# Altium PCB DAP-PCB-REV-4.PcbDoc (part 2 of 4)
Units mil, origin at the board's own origin, x right, y up, seen from the top; angles counter-clockwise.
Board outline 2559.06 x 2559.06 mil, 6 copper layers (L1 (SIG/PWR), L2 (GND), L3 (SIG), L4 (PWR), L5 (GND), L6 (SIG/PWR)), stack 64.976 mil thick; 309 components, 179 nets, 965 pads, 300 vias.
Unrouted connection lines stored in the file: 157.
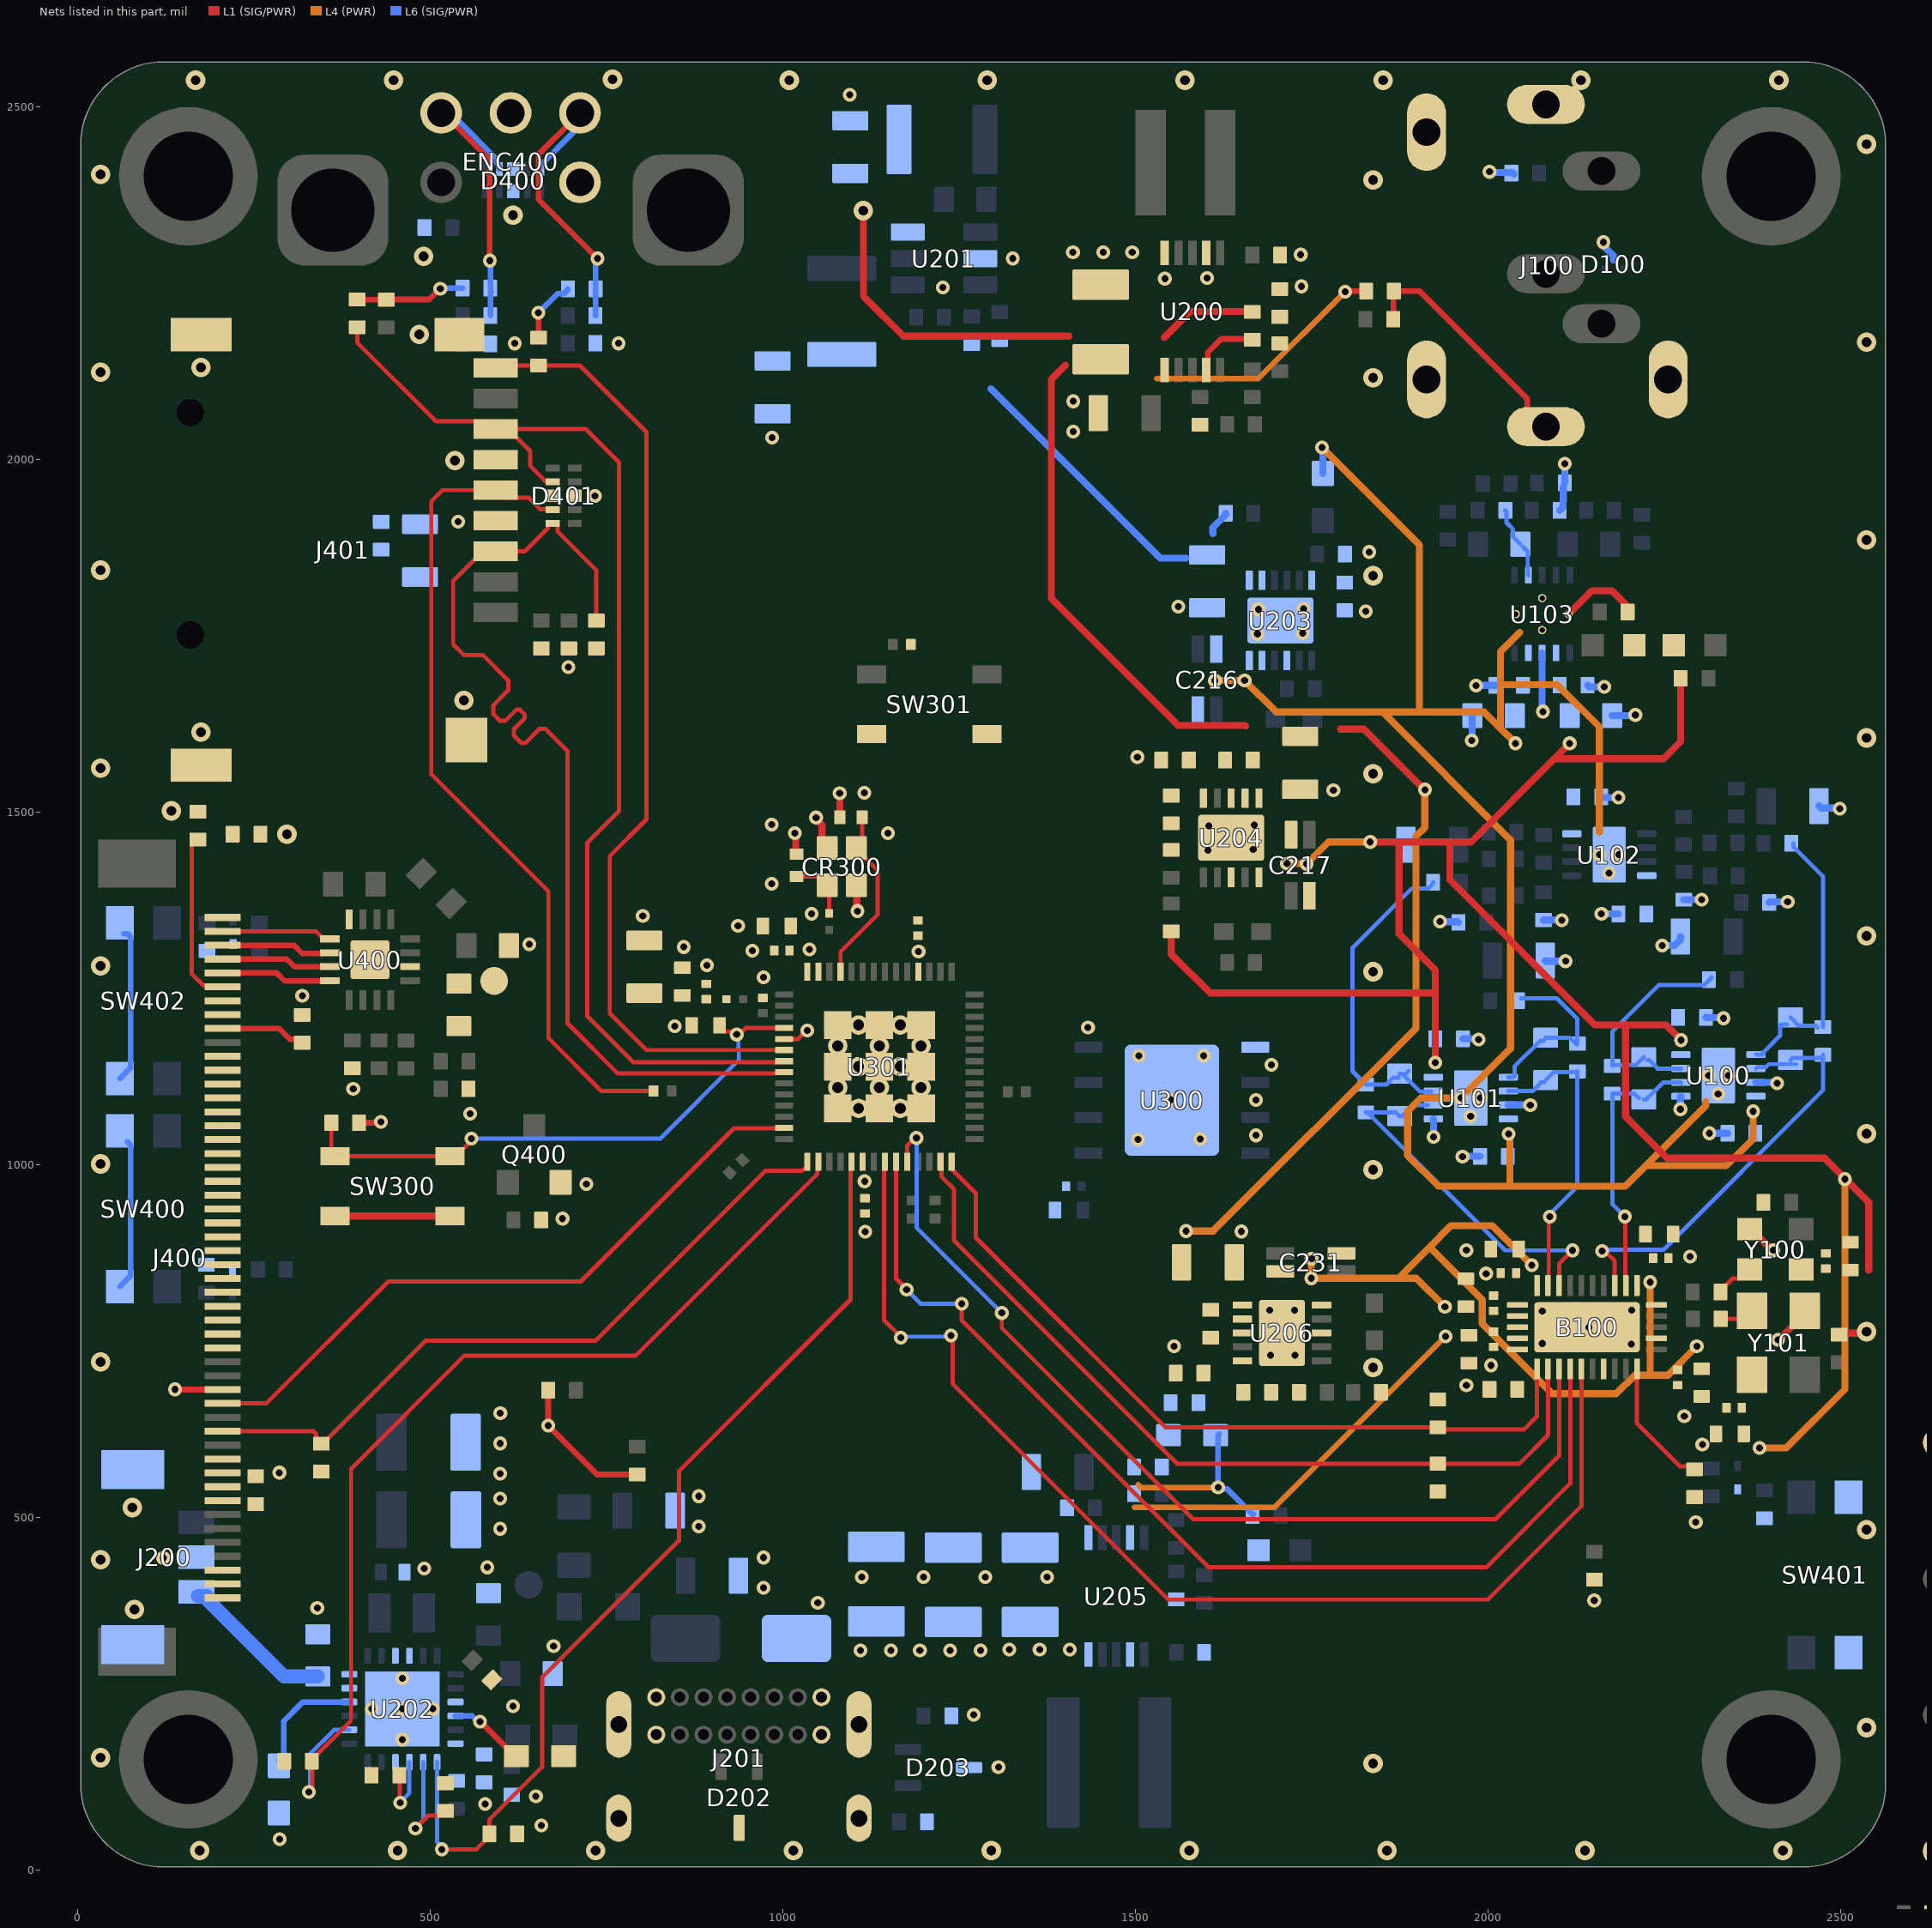
[diagram p5: the nets of this part, all layers, seen from the top]

## Part data (continued)
C103 C104 C112 C114 C116 C120 C139 C302 C303 C306 C307 C311: library part #1-144, <Rating>=25V, <Tolerance>=0.1, <Value>=0.1uF, Manufacturer 1="Murata Electronics", Manufacturer Part Number 1=GRM033R61E104KE14D, Supplier Part Number 1=490-12686-1-ND, <Footprint>=0201, <Spec>=X5R, <Termination>=SMD, AL-PN=#1-144, Creator Project=DAP, Footprint Status=Verified, Lead Time="17 Weeks", PartType=Capacitor, Status=Unverified, SubType=Ceramic, Supplier 1=Digikey, Supplier Label="0.1 µF ±10% 25V Ceramic Capacitor X5R 0201 (0603 Metric)", Type=Standard
C108 C109 C110 C111 C125 C126 C128 C133 C134 C213 C230 C234 C400 C407 C408: library part #1-080, <Rating>=50V, <Tolerance>=0.1, <Value>=0.1uF, Manufacturer 1="Murata Electronics", Manufacturer Part Number 1=GCM155R71H104KE02D, Supplier Part Number 1=490-10672-1-ND, <Footprint>=0402, <Spec>=X7R, <Termination>=SMD, AL-PN=#1-080, Creator Project=DAP, Footprint Status=Verified, Lead Time="21 Weeks", PartType=Capacitor, Status=Unverified, SubType=Ceramic, Supplier 1=Digikey, Supplier Label="0.1 µF ±10% 50V Ceramic Capacitor X7R 0402 (1005 Metric)", Type=Standard
C117: library part #1-103, <Rating>=6.3V, <Tolerance>=0.2, <Value>=4.7uF, Manufacturer 1="Murata Electronics", Manufacturer Part Number 1=GRM155R60J475ME47D, Supplier Part Number 1=490-5915-1-ND, <Footprint>=0402, <Termination>=SMD, AL-PN=#1-103, Creator Project=DAP, Footprint Status=Verified, Lead Time="17 Weeks", PartType=Capacitor, Status=Unverified, SubType=Ceramic, Supplier 1=Digikey, Supplier Label="4.7 µF ±20% 6.3V Ceramic Capacitor X5R 0402 (1005 Metric)", Type=Standard
C118 C123 C132 C137: library part #1-107, <Rating>=50V, <Tolerance>=0.02, <Value>=2.7nF, Manufacturer 1="Murata Electronics", Manufacturer Part Number 1=GRM1555C1H272GE01D, Supplier Part Number 1=490-GRM1555C1H272GE01DCT-ND, <Footprint>=0402, <Spec>=C0G, <Termination>=SMD, AL-PN=#1-107, Creator Project=DAP, Footprint Status=Verified, Lead Time="17 Weeks", PartType=Capacitor, Status=Unverified, SubType=Ceramic, Supplier 1=Digikey, Supplier Label="2700 pF ±2% 50V Ceramic Capacitor C0G, NP0 0402 (1005 Metric)", Type=Standard
C127 C130 C131 C136: library part #1-108, <Rating>=50V, <Tolerance>=0.05, <Value>=13nF, Manufacturer 1="Murata Electronics", Manufacturer Part Number 1=GRM2195C1H133JA01D, Supplier Part Number 1=490-12752-1-ND, <Footprint>=0805, <Spec>=C0G, <Termination>=SMD, AL-PN=#1-108, Creator Project=DAP, Footprint Status=Verified, Lead Time="17 Weeks", PartType=Capacitor, Status=Unverified, SubType=Ceramic, Supplier 1=Digikey, Supplier Label="0.013 µF ±5% 50V Ceramic Capacitor C0G, NP0 0805 (2012 Metric)", Type=Standard
C129 C135 C200 C215 C410 C411 C412 C413: library part #1-132, <Rating>=25V, <Tolerance>=0.1, <Value>=1uF, Manufacturer 1="Murata Electronics", Manufacturer Part Number 1=GCM188R71E105KA64D, Supplier Part Number 1=490-10673-1-ND, <Footprint>=0603, <Spec>=X7R, <Termination>=SMD, AL-PN=#1-132, Creator Project=DAP, Footprint Status=Verified, Lead Time="21 Weeks", PartType=Capacitor, Status=Unverified, SubType=Ceramic, Supplier 1=Digikey, Supplier Label="1 µF ±10% 25V Ceramic Capacitor X7R 0603 (1608 Metric)", Type=Standard
C201 C202: library part #1-070, <Rating>=25V, <Tolerance>=0.1, <Value>=2.2uF, Manufacturer 1="Murata Electronics", Manufacturer Part Number 1=GRM188Z71E225KE43D, Supplier Part Number 1=490-GRM188Z71E225KE43DCT-ND, <Footprint>=0603, <Spec>=X7R, <Termination>=SMD, AL-PN=#1-070, Creator Project=DAP, Footprint Status=Verified, Lead Time="17 Weeks", PartType=Capacitor, Status=Unverified, SubType=Ceramic, Supplier 1=Digikey, Supplier Label="2.2 µF ±10% 25V Ceramic Capacitor X7R 0603 (1608 Metric)", Type=Standard
C203 C206 C211 C218 C220 C224 C232 C304 C409: library part #1-081, <Rating>=10V, <Tolerance>=0.1, <Value>=10uF, Manufacturer 1="Murata Electronics", Manufacturer Part Number 1=GCM21BR71A106KE22K, Supplier Part Number 1=490-14531-1-ND, <Footprint>=0805, <Spec>=X7R, <Termination>=SMD, AL-PN=#1-081, Creator Project=DAP, Footprint Status=Verified, Lead Time="21 Weeks", PartType=Capacitor, Status=Unverified, SubType=Ceramic, Supplier 1=Digikey, Supplier Label="10 µF ±10% 10V Ceramic Capacitor X7R 0805 (2012 Metric)", Type=Standard
C204 C208 C209 C227 C228 C229: library part #1-073, <Rating>=25V, <Tolerance>=0.1, <Value>=22uF, Manufacturer 1="Murata Electronics", Manufacturer Part Number 1=GCM32EC71E226KE36L, Supplier Part Number 1=490-GCM32EC71E226KE36LCT-ND, <Footprint>=1210, <Spec>=X7S, <Termination>=SMD, AL-PN=#1-073, Creator Project=DAP, Footprint Status=Verified, Lead Time="21 Weeks", PartType=Capacitor, Status=Unverified, SubType=Ceramic, Supplier 1=Digikey, Supplier Label="22 µF ±10% 25V Ceramic Capacitor X7S 1210 (3225 Metric)", Type=Standard
C205: library part #1-093, <Rating>=50V, <Tolerance>=0.05, <Value>=22pF, Manufacturer 1="Murata Electronics", Manufacturer Part Number 1=GRM1555C1H220JA01D, Supplier Part Number 1=490-5868-1-ND, <Footprint>=0402, <Spec>=C0G, <Termination>=SMD, AL-PN=#1-093, Creator Project=DAP, Footprint Status=Verified, Lead Time="17 Weeks", PartType=Capacitor, Status=Unverified, SubType=Ceramic, Supplier 1=Digikey, Supplier Label="22 pF ±5% 50V Ceramic Capacitor C0G, NP0 0402 (1005 Metric)", Type=Standard
C207: library part #1-059, <Rating>=16V, <Tolerance>=0.1, <Value>=33nF, Manufacturer 1="Murata Electronics", Manufacturer Part Number 1=GRM155R71C333KA01D, Supplier Part Number 1=490-3257-1-ND, <Footprint>=0402, <Spec>=X7R, <Termination>=SMD, AL-PN=#1-059, Creator Project=DAP, Footprint Status=Verified, Lead Time="17 Weeks", PartType=Capacitor, Status=Unverified, SubType=Ceramic, Supplier 1=Digikey, Supplier Label="0.033 µF ±10% 16V Ceramic Capacitor X7R 0402 (1005 Metric)", Type=Standard
C210: library part #1-048, <Rating>=50V, <Tolerance>=0.1, <Value>=0.1uF, Manufacturer 1="Murata Electronics", Manufacturer Part Number 1=GRM155R71H104KE14D, Supplier Part Number 1=490-10700-1-ND, <Footprint>=0402, <Spec>=X7R, <Termination>=SMD, AL-PN=#1-048, Creator Project=aRTy, Lead Time="17 Weeks", PartType=Capacitor, Status=Unverified, SubType=Ceramic, Supplier 1=Digikey, Supplier Label="0.1 µF ±10% 50V Ceramic Capacitor X7R 0402 (1005 Metric)", Type=Standard
C212 C226: library part #1-077, <Rating>=50V, <Tolerance>=0.02, <Value>=1.5nF, Manufacturer 1="Murata Electronics", Manufacturer Part Number 1=GRM1555C1H152GA01D, Supplier Part Number 1=490-GRM1555C1H152GA01DCT-ND, <Footprint>=0402, <Spec>=C0G, <Termination>=SMD, AL-PN=#1-077, Creator Project=DAP, Footprint Status=Verified, Lead Time="17 Weeks", PartType=Capacitor, Status=Unverified, SubType=Ceramic, Supplier 1=Digikey, Supplier Label="1500 pF ±2% 50V Ceramic Capacitor C0G, NP0 0402 (1005 Metric)", Type=Standard
C214: library part #1-092, <Rating>=35V, <Tolerance>=0.1, <Value>=1uF, Manufacturer 1="Murata Electronics", Manufacturer Part Number 1=GRM155R6YA105KE11D, Supplier Part Number 1=490-10019-1-ND, <Footprint>=0402, <Spec>=X5R, <Termination>=SMD, AL-PN=#1-092, Creator Project=DAP, Footprint Status=Verified, Lead Time="17 Weeks", PartType=Capacitor, Status=Unverified, SubType=Ceramic, Supplier 1=Digikey, Supplier Label="1 µF ±10% 35V Ceramic Capacitor X5R 0402 (1005 Metric)", Type=Standard
C216 C217 C231: library part #1-142, "CAP CER 10UF 10V X7R 0805 - CUT", <Rating>=10V, <Tolerance>=0.1, <Value>=10uF, Manufacturer 1="Murata Electronics", Manufacturer Part Number 1=GCM21BR71A106KE22K, Supplier Part Number 1=490-14531-1-ND, <Footprint>=0805, <Spec>=X7R, <Termination>=SMD, AL-PN=#1-142, Creator Project=DAP, Footprint Status=Verified, Lead Time="21 Weeks", PartType=Capacitor, Status=Unverified, SubType=Ceramic, Supplier 1=Digikey, Supplier Label="10 µF ±10% 10V Ceramic Capacitor X7R 0805 (2012 Metric)", Type=Standard
C219 C221: library part #1-071, <Rating>=16V, <Tolerance>=0.1, <Value>=4.7uF, Manufacturer 1="Murata Electronics", Manufacturer Part Number 1=GRM21BR71C475KE51L, Supplier Part Number 1=490-14466-1-ND, <Footprint>=0805, <Spec>=X7R, <Termination>=SMD, AL-PN=#1-071, Creator Project=DAP, Footprint Status=Verified, Lead Time="17 Weeks", PartType=Capacitor, Status=Unverified, SubType=Ceramic, Supplier 1=Digikey, Supplier Label="4.7 µF ±10% 16V Ceramic Capacitor X7R 0805 (2012 Metric)", Type=Standard
C222 C223 C233: library part #1-098, <Rating>=16V, <Tolerance>=0.2, <Value>=2.2uF, Manufacturer 1="Vishay Sprague", Manufacturer Part Number 1=298D225X0016M2T, Supplier Part Number 1=718-1613-1-ND, <Footprint>=0603, <Termination>=SMD, AL-PN=#1-098, Creator Project=DAP, Footprint Status=Verified, Lead Time="23 Weeks", PartType=Capacitor, Status=Unverified, SubType=Tantalum, Supplier 1=Digikey, Supplier Label="2.2 µF Molded Tantalum Capacitors 16 V 0603 (1608 Metric) 12Ohm", Type=Standard
C225: library part #1-096, <Rating>=50V, <Tolerance>=0.05, <Value>=100pF, Manufacturer 1="Murata Electronics", Manufacturer Part Number 1=GRM1555C1H101JA01D, Supplier Part Number 1=490-5922-1-ND, <Footprint>=0402, <Spec>=C0G, <Termination>=SMD, AL-PN=#1-096, Creator Project=DAP, Footprint Status=Verified, Lead Time="17 Weeks", PartType=Capacitor, Status=Unverified, SubType=Ceramic, Supplier 1=Digikey, Supplier Label="100 pF ±5% 50V Ceramic Capacitor C0G, NP0 0402 (1005 Metric)", Type=Standard
C300: library part #1-145, <Rating>=10V, <Tolerance>=0.1, <Value>=10nF, Manufacturer 1="Murata Electronics", Manufacturer Part Number 1=GRM033R71A103KA01D, Supplier Part Number 1=490-3194-1-ND, <Footprint>=0201, <Spec>=X7R, <Termination>=SMD, AL-PN=#1-145, Creator Project=DAP, Footprint Status=Verified, Lead Time="17 Weeks", PartType=Capacitor, Status=Unverified, SubType=Ceramic, Supplier 1=Digikey, Supplier Label="10000 pF ±10% 10V Ceramic Capacitor X7R 0201 (0603 Metric)", Type=Standard
C308 C310: library part #1-122, <Rating>=50V, <Tolerance>=0.01, <Value>=12pF, Manufacturer 1="Murata Electronics", Manufacturer Part Number 1=GJM1555C1H120FB01D, Supplier Part Number 1=490-11190-1-ND, <Footprint>=0402, <Spec>=C0G, <Termination>=SMD, AL-PN=#1-122, Creator Project=DAP, Footprint Status=Verified, Lead Time="17 Weeks", PartType=Capacitor, Status=Unverified, SubType=Ceramic, Supplier 1=Digikey, Supplier Label="12 pF ±1% 50V Ceramic Capacitor C0G, NP0 0402 (1005 Metric)", Type=Standard
C404 C405: library part #1-040, <Rating>=16V, <Tolerance>=0.1, <Value>=10nF, Manufacturer 1=YAGEO, Manufacturer Part Number 1=CC0402KRX7R7BB103, Supplier Part Number 1=311-1042-2-ND, <Footprint>=0402, <Spec>=X7R, <Termination>=SMD, AL-PN=#1-040, Creator Project=aRTy, Footprint Status=Verified, Lead Time="21 Weeks", PartType=Capacitor, Status=Unverified, SubType=Ceramic, Supplier 1=Digikey, Supplier Label="10000 pF ±10% 16V Ceramic Capacitor X7R 0402 (1005 Metric)", Type=Standard
CR300: library part #1-118, <Rating>=10pF, <Value>="40 MHz", Manufacturer 1="ECS Inc.", Manufacturer Part Number 1=ECS-400-10-37B2-CKY-TR, Supplier Part Number 1=50-ECS-400-10-37B2-CKY-TRCT-ND, <Spec>=40Ohm, <Termination>=SMD, AL-PN=#1-118, Creator Project=DAP, Footprint Status=Verified, Lead Time=N/A, PartType=Crystal, Status=Unverified, Supplier 1=Digikey, Supplier Label="40 MHz ±10ppm Crystal 12pF 40 Ohms 4-SMD, No Lead", Type=Standard
D100: library part #1-112, <Rating>=0.2pF, <Value>=8.4V(Cl), Manufacturer 1="Texas Instruments", Manufacturer Part Number 1=ESD122DMXR, Supplier Part Number 1=296-48543-1-ND, <Termination>=SMD, AL-PN=#1-112, Creator Project=DAP, Footprint Status=Verified, Lead Time="9 Weeks", PartType=Diode, Status=Unverified, SubType=TVS, Supplier 1=Digikey, Supplier Label="8.4V (Typ) Clamp 2.5A (8/20µs) Ipp Tvs Diode Surface Mount 3-X2SON (1x0.6)", Type=Standard
D200 D204 D205 D206 D207 D208 D209: library part #1-009, <Rating>=30mA, <Value>=2.1V, Manufacturer 1="Lite-On Inc", Manufacturer Part Number 1=LTST-C190GKT, Supplier Part Number 1=160-LTST-C190GKTTR-ND, <Spec>=GREEN, <Termination>=SMD, AL-PN=#1-009, Creator Project=Bootcamp, Footprint Status=Verified, Lead Time="14 Weeks", PartType=Diode, Status=Unverified, SubType=LED, Supplier 1=Digikey, Supplier Label="Green 569nm LED Indication - Discrete 2.1V 0603 (1608 Metric)", Type=Standard
D201: library part #1-049, <Rating>=7.78V(Bd), <Value>=12V(Cl), Manufacturer 1="Diodes Incorporated", Manufacturer Part Number 1=SMAJ7.0A-13-F, Supplier Part Number 1=SMAJ7.0A-FDICT-ND, <Spec>=7V(Rv), <Termination>=SMD, AL-PN=#1-049, Creator Project=aRTy, Footprint Status=Verified, Lead Time="12 Weeks", PartType=Diode, Status=Unverified, SubType=TVS, Supplier 1=Digikey, Supplier Label="12V Clamp 33.3A Ipp Tvs Diode Surface Mount SMA", Type=Standard
D202 D203: library part #1-099, <Rating>=1.5pF, <Value>=12.4V(Cl), Manufacturer 1="Texas Instruments", Manufacturer Part Number 1=TPD2E2U06QDCKRQ1, Supplier Part Number 1=296-44302-1-ND, <Spec>=20kV, <Termination>=SMD, AL-PN=#1-099, Creator Project=DAP, Footprint Status=Verified, Lead Time="9 Weeks", PartType=Diode, Status=Unverified, SubType=TVS, Supplier 1=Digikey, Supplier Label="12.4V (Typ) Clamp 5.5A (8/20µs) Ipp Tvs Diode Surface Mount SC-70-3", Type=Standard
D400 D401: library part #1-152, <Rating>=10V(Cl), <Value>=5v(Rf), Manufacturer 1=onsemi, Manufacturer Part Number 1=ESD7004MUTAG, Supplier Part Number 1=ESD7004MUTAGOSCT-ND, <Termination>=SMD, AL-PN=#1-152, Copyright="Copyright (C) 2026 Ultra Librarian. All rights reserved.", Creator Project=DAP, Footprint Status=Verified, Lead Time="99 Weeks", Manufacturer_Name=onsemi, Manufacturer_Part_Number=ESD7004MUTAG, PartType=Diode, RefDes=RefDes, Status=Unverified, SubType=TVS, Supplier 1=Digikey, Supplier Label="10V Clamp 1A (8/20µs) Ipp Tvs Diode Surface Mount 10-UDFN (2.5x1)", Type=Standard
D402 D403 D404: library part #1-141, <Rating>=12.3V(Cl), <Value>=5V(Rf), Manufacturer 1=onsemi, Manufacturer Part Number 1=ESD9X5.0ST5G, Supplier Part Number 1=ESD9X5.0ST5GOSCT-ND, <Termination>=SMD, AL-PN=#1-141, Creator Project=DAP, Footprint Status=Verified, Lead Time="57 Weeks", PartType=Diode, Status=Unverified, SubType=TVS, Supplier 1=Digikey, Supplier Label="12.3V Clamp 8.7A (8/20µs) Ipp Tvs Diode Surface Mount SOD-923", Type=Standard
ENC400: library part #1-135, Manufacturer 1="TT Electronics", Manufacturer Part Number 1=EN12-VS11AF18, Supplier Part Number 1=987-1198-ND, <Termination>=Thru, AL-PN=#1-135, Creator Project=DAP, Footprint Status=Unverified, Lead Time="34 Weeks", Notes="Bad Drawing", PartType=Encoder, Status=Unverified, SubType=Quadrature, Supplier 1=Digikey, Supplier Label="Rotary Encoder Mechanical 12 Quadrature (Incremental) Right Angle", Type=Standard
FB200: library part #1-068, <Rating>=3A, <Value>=120Ohm, Manufacturer 1="Würth Elektronik", Manufacturer Part Number 1=742792023, Supplier Part Number 1=732-1613-1-ND, <Footprint>=0805, <Termination>=SMD, AL-PN=#1-068, Creator Project=DAP, Footprint Status=Verified, Lead Time="33 Weeks", PartType=Misc, Status=Unverified, SubType="Ferrite Bead", Supplier 1=Digikey, Supplier Label="120 Ohms @ 100 MHz 1 Signal Line Ferrite Bead 0805 (2012 Metric) 3A 30mOhm", Type=Standard
J100: library part #1-111, <Value>=3.5mm, Manufacturer 1="Same Sky", Manufacturer Part Number 1=SJ1-3535NS, Package=None, Supplier Part Number 1=CP1-3535NS-ND, <Termination>=Thru, AL-PN=#1-111, Check_prices=https://www.snapeda.com/parts/SJ1-3535NS/Same+Sky/view-part/?ref=eda, Creator Project=DAP, Footprint Status=Verified, Lead Time="19 Weeks", MF="Same Sky", MP=SJ1-3535NS, PartType=Connector, SnapEDA_Link=https://www.snapeda.com/parts/SJ1-3535NS/Same+Sky/view-part/?ref=snap, Status=Unverified, SubType=Audio, Supplier 1=Digikey, Supplier Label="3.50mm (0.141\", 1/8\", Mini Plug) - Headphone Phone Jack Stereo (3 Conductor, TRS) Connector Solder", Type=Standard
J200: library part #1-137, <Value>=3x1, Manufacturer 1=Molex, Manufacturer Part Number 1=5055670381, Package=None, Supplier Part Number 1=WM22227CT-ND, <Termination>=SMD, AL-PN=#1-137, Availability=Unavailable, Creator Project=DAP, Footprint Status=Unverified, Lead Time="19 Weeks", MF="{'manufacturer': u'Molex'}", MP=436500329, Notes="No Drawing", PartType=Connector, Price=None, Status=Unverified, SubType=Header, Supplier 1=Digikey, Supplier Label="Connector Header Surface Mount, Right Angle 3 position 0.049\" (1.25mm)", Type=Standard
J201: library part #1-069, <Rating>=5A, <Value>=48V, Manufacturer 1=GCT, Manufacturer Part Number 1=USB4085-GF-A, Package=None, Supplier Part Number 1=2073-USB4085-GF-ACT-ND, <Spec>=USB-C, <Termination>=Thru, AL-PN=#1-069, Availability="In Stock", Check_prices=https://www.snapeda.com/parts/USB4085-GF-A/Global+Connector+Technology/view-part/?ref=eda, Creator Project=DAP, Footprint Status=Verified, Lead Time="7 Weeks", MF="Global Connector Technology", MP=USB4085-GF-A, PartType=Connector, Price=None, Purchase-URL=https://pricing.snapeda.com/search/part/USB4085-GF-A/?ref=eda, SnapEDA_Link=https://www.snapeda.com/parts/USB4085-GF-A/Global+Connector+Technology/view-part/?ref=snap, Status=Unverified, SubType=USB, Supplier 1=Digikey, Supplier Label="USB-C (USB TYPE-C) USB 2.0 Receptacle Connector 24 (16+8 Dummy) Position Through Hole, Right Angle", Type=Standard
J400: library part #1-117, <Value>=50-Pin, Manufacturer 1="Amphenol ICC", Manufacturer Part Number 1=F32D-1A7Y1-21050, Package=None, Supplier Part Number 1=609-F32D-1A7Y1-21050CT-ND, <Footprint>=R/A, <Termination>=SMD, AL-PN=#1-117, Check_prices=https://www.snapeda.com/parts/F32D-1A7Y1-21050/Amphenol+FCI/view-part/?ref=eda, Creator Project=DAP, Footprint Status=Verified, Lead Time="13 Weeks", MF="Amphenol ICC (FCI)", MP=F32D-1A7Y1-21050, PartType=Connector, SnapEDA_Link=https://www.snapeda.com/parts/F32D-1A7Y1-21050/Amphenol+FCI/view-part/?ref=snap, Status=Unverified, SubType=FFC, Supplier 1=Digikey, Supplier Label="50 Position FFC, FPC Connector Contacts, Top and Bottom 0.020\" (0.50mm) Surface Mount, Right Angle", Type=Standard
J401: library part #1-126, Manufacturer 1="Same Sky", Manufacturer Part Number 1=MSD-1-A, Package=None, Supplier Part Number 1=2223-MSD-1-ACT-ND, <Termination>=SMD, AL-PN=#1-126, Check_prices=https://www.snapeda.com/parts/MSD-1-A/Same+Sky/view-part/?ref=eda, Creator Project=DAP, Footprint Status=Verified, Lead Time="8 Weeks", MF="Same Sky", MP=MSD-1-A, PartType=Connector, SnapEDA_Link=https://www.snapeda.com/parts/MSD-1-A/Same+Sky/view-part/?ref=snap, Status=Unverified, SubType=Micro-SD, Supplier 1=Digikey, Supplier Label="9 (8 + 1) Position Card Connector microSD™ Surface Mount, Right Angle Gold", Type=Standard
L200: library part #1-076, <Rating>=3.5A, <Tolerance>=0.2, <Value>=6.8uH, Manufacturer 1="Bourns Inc.", Manufacturer Part Number 1=SRP4030FA-6R8M, Supplier Part Number 1=SRP4030FA-6R8MCT-ND, <Spec>=74.1mOhm, <Termination>=SMD, AL-PN=#1-076, Creator Project=DAP, Footprint Status=Verified, Lead Time="22 Weeks", PartType=Inductor, Status=Unverified, SubType=Shielded, Supplier 1=Digikey, Supplier Label="6.8 µH Shielded Drum Core, Wirewound Inductor 4 A 74.1mOhm Max Nonstandard", Type=Standard
L201 L202: library part #1-090, <Rating>=400mA, <Tolerance>=0.2, <Value>=22uH, Manufacturer 1="Murata Electronics", Manufacturer Part Number 1=490-LQW32FT220M2HLTR, Supplier Part Number 1=490-LQW32FT220M2HLCT-ND, <Footprint>=1210, <Spec>=810mOhm, <Termination>=SMD, AL-PN=#1-090, Creator Project=DAP, Footprint Status=Verified, Lead Time="25 Weeks", Notes="No 3D", PartType=Inductor, Status=Unverified, SubType=Shielded, Supplier 1=Digikey, Supplier Label="22 µH Shielded Wirewound Inductor 300 mA 810mOhm Max 1210 (3225 Metric)", Type=Standard
L203: library part #1-151, <Rating>=2A, <Tolerance>=0.2, <Value>=1uH, Manufacturer 1="Murata Electronics", Manufacturer Part Number 1=DFE201210U-1R0M=P2, Supplier Part Number 1=490-18104-1-ND, <Spec>=95mOhm, <Termination>=SMD, AL-PN=#1-151, Creator Project=DAP, Footprint Status=Verified, Lead Time="21 Weeks", PartType=Inductor, Status=Unverified, SubType=Shielded, Supplier 1=Digikey, Supplier Label="1 µH Shielded Drum Core, Wirewound Inductor 2 A 95mOhm Max 0805 (2012 Metric)", Type=Standard
L204: library part #1-094, <Rating>=3.7A, <Tolerance>=0.2, <Value>=18uH, Manufacturer 1=Coilcraft, Manufacturer Part Number 1=XGL5050-183MEC, Supplier Part Number 1=2457-XGL5050-183MEC-ND, <Spec>=62.5mOhm, <Termination>=SMD, AL-PN=#1-094, Creator Project=DAP, Footprint Status=Verified, Lead Time=N/A, PartType=Inductor, Status=Unverified, SubType=Shielded, Supplier 1=Digikey, Supplier Label="18 µH Shielded Molded Inductor 4.5 A 62.5mOhm Max Nonstandard", Type=Standard
L300: library part #1-143, <Rating>=600mA, <Value>=2nH, Manufacturer 1="Murata Electronics", Manufacturer Part Number 1=LQP03HQ2N0B02D, Supplier Part Number 1=490-13895-1-ND, <Footprint>=0201, <Spec>=120mOhm, <Termination>=SMD, AL-PN=#1-143, Creator Project=DAP, Footprint Status=Verified, Lead Time="15 Weeks", PartType=Inductor, Status=Unverified, SubType=Shielded, Supplier 1=Digikey, Supplier Label="2 nH Unshielded Thick Film Inductor 600 mA 120mOhm Max 0201 (0603 Metric)", Type=Standard
L301: library part #1-150, <Rating>=140mA, <Tolerance>=0.03, <Value>=24nH, Manufacturer 1="Murata Electronics", Manufacturer Part Number 1=LQP03TN24NH02D, Supplier Part Number 1=490-13004-1-ND, <Footprint>=0201, <Spec>=2.3Ohm, <Termination>=SMD, AL-PN=#1-150, Creator Project=DAP, Footprint Status=Verified, Lead Time="15 Weeks", PartType=Inductor, Status=Unverified, SubType=Shielded, Supplier 1=Digikey, Supplier Label="24 nH Unshielded Thick Film Inductor 140 mA 2.3Ohm Max 0201 (0603 Metric)", Type=Standard
Q400: library part #1-130, <Rating>=2.5Vgs, <Value>=N-Type, Manufacturer 1=MCC, Manufacturer Part Number 1=2N7002-TP, Package="TO-236 MCC", Supplier Part Number 1=2N7002-TPMSCT-ND, <Termination>=SMD, AL-PN=#1-130, Check_prices=https://www.snapeda.com/parts/2N7002-TP/Micro+Commercial/view-part/?ref=eda, Creator Project=DAP, Footprint Status=Verified, Lead Time=N/A, MF="Micro Commercial", MP=2N7002-TP, PartType=Transistor, SnapEDA_Link=https://www.snapeda.com/parts/2N7002-TP/Micro+Commercial/view-part/?ref=snap, Status=Unverified, SubType=MOSFET, Supplier 1=Digikey, Supplier Label="N-Channel 60 V 115mA (Ta) 1.08W Surface Mount SOT-23", Type=Standard
R100 R101 R102 R103 R116 R117 R121 R123 R131 R134: library part #1-105, <Rating>=1/16W, <Tolerance>=0.001, <Value>=499Ohm, Manufacturer 1=YAGEO, Manufacturer Part Number 1=RT0402BRD07499RL, Supplier Part Number 1=YAG1440CT-ND, <Footprint>=0402, <Termination>=SMD, AL-PN=#1-105, Creator Project=DAP, Footprint Status=Verified, Lead Time="23 Weeks", PartType=Resistor, Status=Unverified, Supplier 1=Digikey, Supplier Label="499 Ohms ±0.1% 0.063W, 1/16W Chip Resistor 0402 (1005 Metric) Thin Film", Type=Standard
R104 R105: library part #1-102, <Rating>=1/16W, <Tolerance>=0.01, <Value>=22Ohm, Manufacturer 1=YAGEO, Manufacturer Part Number 1=RC0402FR-0722RL, Supplier Part Number 1=311-22.0LRCT-ND, <Footprint>=0402, <Termination>=SMD, AL-PN=#1-102, Creator Project=DAP, Footprint Status=Verified, Lead Time="22 Weeks", PartType=Resistor, Status=Unverified, Supplier 1=Digikey, Supplier Label="22 Ohms ±1% 0.063W, 1/16W Chip Resistor 0402 (1005 Metric) Moisture Resistant Thick Film", Type=Standard
R106 R107 R111 R112 R113 R119 R129 R135 R208 R209 R210 R211 R216 R221 R223 R242 R300 R301 R400 R401 R402 R403 R404 R405 R406 R407 R408 R412 R413 R414 R415 R416 R417 R418 R419 R422: library part #1-134, <Tolerance>=0.01, <Value>=10kOhm, Manufacturer 1=YAGEO, Manufacturer Part Number 1=AC0402FR-0710KL, Supplier Part Number 1=YAG3436CT-ND, <Footprint>=0402, <Termination>=SMD, AL-PN=#1-134, Creator Project=DAP, Footprint Status=Verified, Lead Time="22 Weeks", PartType=Resistor, Status=Unverified, Supplier 1=Digikey, Supplier Label="10 kOhms ±1% 0.063W, 1/16W Chip Resistor 0402 (1005 Metric) Automotive AEC-Q200, Moisture Resistant Thick Film", Type=Standard
R108 R207 R226 R231 R238 R247: library part #1-138, <Tolerance>=0.001, <Value>=49.9kOhm, Manufacturer 1=YAGEO, Manufacturer Part Number 1=RT0402BRD0749K9L, Supplier Part Number 1=YAG4270CT-ND, <Footprint>=0402, <Termination>=SMD, AL-PN=#1-138, Creator Project=DAP, Footprint Status=Verified, Lead Time="23 Weeks", PartType=Resistor, Status=Unverified, Supplier 1=Digikey, Supplier Label="49.9 kOhms ±0.1% 0.063W, 1/16W Chip Resistor 0402 (1005 Metric) Thin Film", Type=Standard
R114 R115 R126 R133: library part #1-109, <Rating>=1/16W, <Tolerance>=0.001, <Value>=220Ohm, Manufacturer 1=YAGEO, Manufacturer Part Number 1=RT0402BRD07220RL, Supplier Part Number 1=YAG4207CT-ND, <Footprint>=0402, <Termination>=SMD, AL-PN=#1-109, Creator Project=DAP, Footprint Status=Verified, Lead Time="23 Weeks", PartType=Resistor, Status=Unverified, Supplier 1=Digikey, Supplier Label="220 Ohms ±0.1% 0.063W, 1/16W Chip Resistor 0402 (1005 Metric) Thin Film", Type=Standard
R118 R204 R205 R212 R228 R239 R240 R241 R245 R420 R421 R424 R425: library part #1-131, <Tolerance>=0.01, <Value>=100kOhm, Manufacturer 1=YAGEO, Manufacturer Part Number 1=RT0402BRD07100KL, Supplier Part Number 1=YAG1343CT-ND, <Footprint>=0402, <Termination>=SMD, AL-PN=#1-131, Creator Project=DAP, Footprint Status=Verified, Lead Time="23 Weeks", PartType=Resistor, Status=Unverified, Supplier 1=Digikey, Supplier Label="100 kOhms ±0.1% 0.063W, 1/16W Chip Resistor 0402 (1005 Metric) Thin Film", Type=Standard
R120 R122 R124 R132: library part #1-110, <Rating>=1/16W, <Tolerance>=0.001, <Value>=681Ohm, Manufacturer 1=YAGEO, Manufacturer Part Number 1=RT0402BRD07681RL, Supplier Part Number 1=YAG1466CT-ND, <Footprint>=0402, <Termination>=SMD, AL-PN=#1-110, Creator Project=DAP, Footprint Status=Verified, Lead Time="23 Weeks", PartType=Resistor, Status=Unverified, Supplier 1=Digikey, Supplier Label="681 Ohms ±0.1% 0.063W, 1/16W Chip Resistor 0402 (1005 Metric) Thin Film", Type=Standard
R125 R127: library part #1-113, <Rating>=1/16W, <Tolerance>=0.001, <Value>=4.7Ohm, Manufacturer 1=YAGEO, Manufacturer Part Number 1=RT0402BRE074R7L, Supplier Part Number 1=13-RT0402BRE074R7LCT-ND, <Footprint>=0402, <Termination>=SMD, AL-PN=#1-113, Creator Project=DAP, Footprint Status=Verified, Lead Time="23 Weeks", PartType=Resistor, Status=Unverified, Supplier 1=Digikey, Supplier Label="4.7 Ohms ±0.1% 0.063W, 1/16W Chip Resistor 0402 (1005 Metric) Thin Film", Type=Standard
R128 R203 R237: library part #1-079, <Rating>=1/16W, <Tolerance>=0.001, <Value>=54.9kOhm, Manufacturer 1=YAGEO, Manufacturer Part Number 1=RT0402BRD0754K9L, Supplier Part Number 1=YAG1452CT-ND, <Footprint>=0402, <Termination>=SMD, AL-PN=#1-079, Creator Project=DAP, Footprint Status=Verified, Lead Time="20 Weeks", PartType=Resistor, Status=Unverified, Supplier 1=Digikey, Supplier Label="54.9 kOhms ±0.1% 0.063W, 1/16W Chip Resistor 0402 (1005 Metric) Thin Film", Type=Standard
R200: library part #1-074, <Rating>=1/16W, <Tolerance>=0.001, <Value>=220kOhm, Manufacturer 1=YAGEO, Manufacturer Part Number 1=RC0402BR-07220KL, Supplier Part Number 1=13-RC0402BR-07220KLCT-ND, <Footprint>=0402, <Termination>=SMD, AL-PN=#1-074, Creator Project=DAP, Footprint Status=Verified, Lead Time="17 Weeks", PartType=Resistor, Status=Unverified, Supplier 1=Digikey, Supplier Label="220 kOhms ±0.1% 0.063W, 1/16W Chip Resistor 0402 (1005 Metric) Moisture Resistant Thick Film", Type=Standard
R201: library part #1-091, <Rating>=1/16W, <Tolerance>=0.001, <Value>=309kOhm, Manufacturer 1=YAGEO, Manufacturer Part Number 1=RE0402BRE07309KL, Supplier Part Number 1=13-RE0402BRE07309KLCT-ND, <Footprint>=0402, <Termination>=SMD, AL-PN=#1-091, Creator Project=DAP, Footprint Status=Verified, Lead Time="20 Weeks", PartType=Resistor, Status=Unverified, Supplier 1=Digikey, Supplier Label="309 kOhms ±0.1% 0.063W, 1/16W Chip Resistor 0402 (1005 Metric) Thick Film", Type=Standard
R202: library part #1-067, <Rating>=0.1W, <Tolerance>=0.005, <Value>=274kOhm, Manufacturer 1=YAGEO, Manufacturer Part Number 1=RT0603DRE07274KL, Supplier Part Number 1=13-RT0603DRE07274KLCT-ND, <Footprint>=0603, <Termination>=SMD, AL-PN=#1-067, Creator Project=DAP, Footprint Status=Verified, Lead Time="20 Weeks", PartType=Resistor, Status=Unverified, Supplier 1=Digikey, Supplier Label="RES SMD 274K OHM 0.5% 1/10W 0603", Type=Standard
R206 R229 R246 R249 R250 R251 R252 R253 R409 R410 R411: library part #1-043, <Rating>=1/16W, <Tolerance>=0.001, <Value>=1kOhm, Manufacturer 1=YAGEO, Manufacturer Part Number 1=RT0402BRD071KL, Supplier Part Number 1=YAG1386TR-ND, <Footprint>=0402, <Termination>=SMD, AL-PN=#1-043, Creator Project=aRTy, Footprint Status=Verified, Lead Time="20 Weeks", PartType=Resistor, Status=Unverified, Supplier 1=Digikey, Supplier Label="1 kOhms ±0.1% 0.063W, 1/16W Chip Resistor 0402 (1005 Metric) Thin Film", Type=Standard
R213 R224: library part #1-078, <Rating>=1/16W, <Tolerance>=0.001, <Value>=15kOhm, Manufacturer 1=YAGEO, Manufacturer Part Number 1=RT0402BRD0715KL, Supplier Part Number 1=YAG2302CT-ND, <Footprint>=0402, <Termination>=SMD, AL-PN=#1-078, Creator Project=DAP, Footprint Status=Verified, Lead Time="20 Weeks", PartType=Resistor, Status=Unverified, Supplier 1=Digikey, Supplier Label="15 kOhms ±0.1% 0.063W, 1/16W Chip Resistor 0402 (1005 Metric) Thin Film", Type=Standard
R214: library part #1-060, <Rating>=1/16W, <Tolerance>=0.01, <Value>=5kOhm, Manufacturer 1=YAGEO, Manufacturer Part Number 1=RC0402FR-075KL, Supplier Part Number 1=13-RC0402FR-075KLCT-ND, <Footprint>=0402, <Termination>=SMD, AL-PN=#1-060, Creator Project=DAP, Footprint Status=Verified, Lead Time="17 Weeks", PartType=Resistor, Status=Unverified, Supplier 1=Digikey, Supplier Label="5 kOhms ±1% 0.063W, 1/16W Chip Resistor 0402 (1005 Metric) Moisture Resistant Thick Film", Type=Standard
R215: library part #1-061, <Rating>=1/16W, <Tolerance>=0.005, <Value>=9.88kOhm, Manufacturer 1=YAGEO, Manufacturer Part Number 1=RT0402DRD079K88L, Supplier Part Number 1=311-2214-1-ND, <Footprint>=0402, <Termination>=SMD, AL-PN=#1-061, Creator Project=DAP, Footprint Status=Verified, Lead Time="20 Weeks", PartType=Resistor, Status=Unverified, Supplier 1=Digikey, Supplier Label="9.88 kOhms ±0.5% 0.063W, 1/16W Chip Resistor 0402 (1005 Metric) Thin Film", Type=Standard
R217: library part #1-065, <Rating>=0.1W, <Tolerance>=0.01, <Value>=270Ohm, Manufacturer 1=YAGEO, Manufacturer Part Number 1=RC0603FR-07270RL, Supplier Part Number 1=311-270HRCT-ND, <Footprint>=0603, <Termination>=SMD, AL-PN=#1-065, Creator Project=DAP, Footprint Status=Verified, Lead Time="17 Weeks", PartType=Resistor, Status=Unverified, Supplier 1=Digikey, Supplier Label="270 Ohms ±1% 0.1W, 1/10W Chip Resistor 0603 (1608 Metric) Moisture Resistant Thick Film", Type=Standard
R218: library part #1-064, <Rating>=0.1W, <Tolerance>=0.001, <Value>=500Ohm, Manufacturer 1=YAGEO, Manufacturer Part Number 1=RT0603BRC07500RL, Supplier Part Number 1=13-RT0603BRC07500RLCT-ND, <Footprint>=0603, <Termination>=SMD, AL-PN=#1-064, Creator Project=DAP, Footprint Status=Verified, Lead Time="20 Weeks", PartType=Resistor, Status=Unverified, Supplier 1=Digikey, Supplier Label="500 Ohms ±0.1% 0.1W, 1/10W Chip Resistor 0603 (1608 Metric) Thin Film", Type=Standard
R219: library part #1-087, <Rating>=1/16W, <Tolerance>=0.01, <Value>=88.7kOhm, Manufacturer 1=YAGEO, Manufacturer Part Number 1=RC0402FR-0788K7L, Supplier Part Number 1=311-88.7KLRCT-ND, <Footprint>=0402, <Termination>=SMD, AL-PN=#1-087, Creator Project=DAP, Footprint Status=Verified, Lead Time="17 Weeks", PartType=Resistor, Status=Unverified, Supplier 1=Digikey, Supplier Label="88.7 kOhms ±1% 0.063W, 1/16W Chip Resistor 0402 (1005 Metric) Moisture Resistant Thick Film", Type=Standard
R220: library part #1-086, <Rating>=1/10W, <Tolerance>=0.001, <Value>=135kOhm, Manufacturer 1=YAGEO, Manufacturer Part Number 1=RT0603BRD07135KL, Supplier Part Number 1=13-RT0603BRD07135KLCT-ND, <Footprint>=0603, <Termination>=SMD, AL-PN=#1-086, Creator Project=DAP, Footprint Status=Verified, Lead Time="20 Weeks", PartType=Resistor, Status=Unverified, Supplier 1=Digikey, Supplier Label="135 kOhms ±0.1% 0.1W, 1/10W Chip Resistor 0603 (1608 Metric) Thin Film", Type=Standard
R222 R243: library part #1-083, <Rating>=1/16W, <Tolerance>=0.01, <Value>=909kOhm, Manufacturer 1=YAGEO, Manufacturer Part Number 1=RC0402FR-07909KL, Supplier Part Number 1=YAG2377CT-ND, <Footprint>=0402, <Termination>=SMD, AL-PN=#1-083, Creator Project=DAP, Footprint Status=Verified, Lead Time="17 Weeks", PartType=Resistor, Status=Unverified, Supplier 1=Digikey, Supplier Label="909 kOhms ±1% 0.063W, 1/16W Chip Resistor 0402 (1005 Metric) Moisture Resistant Thick Film", Type=Standard
R225 R244: library part #1-084, <Rating>=1/16W, <Tolerance>=0.001, <Value>=90.9kOhm, Manufacturer 1=YAGEO, Manufacturer Part Number 1=RT0402BRD0790K9L, Supplier Part Number 1=YAG1489CT-ND, <Footprint>=0402, <Termination>=SMD, AL-PN=#1-084, Creator Project=DAP, Footprint Status=Verified, Lead Time="20 Weeks", PartType=Resistor, Status=Unverified, Supplier 1=Digikey, Supplier Label="90.9 kOhms ±0.1% 0.063W, 1/16W Chip Resistor 0402 (1005 Metric) Thin Film", Type=Standard
R227: library part #1-149, <Rating>=1/4W, <Tolerance>=0.01, <Value>=0.5Ohms, Manufacturer 1=YAGEO, Manufacturer Part Number 1=PT0805FR-7W0R5L, Supplier Part Number 1=13-PT0805FR-7W0R5LCT-ND, <Footprint>=0805, <Termination>=SMD, AL-PN=#1-149, Creator Project=DAP, Footprint Status=Verified, Lead Time="20 Weeks", PartType=Resistor, Status=Unverified, Supplier 1=Digikey, Supplier Label="500 mOhms ±1% 0.25W, 1/4W Chip Resistor 0805 (2012 Metric) Automotive AEC-Q200, Current Sense, Moisture Resistant Thick Film", Type=Standard
R230: library part #1-088, <Rating>=1/16W, <Tolerance>=0.01, <Value>=15.4kOhm, Manufacturer 1=YAGEO, Manufacturer Part Number 1=RT0402BRD0715K4L, Supplier Part Number 1=YAG4177CT-ND, <Footprint>=0402, <Termination>=SMD, AL-PN=#1-088, Creator Project=DAP, Footprint Status=Verified, Lead Time="20 Weeks", PartType=Resistor, Status=Unverified, Supplier 1=Digikey, Supplier Label="15.4 kOhms ±0.1% 0.063W, 1/16W Chip Resistor 0402 (1005 Metric) Thin Film", Type=Standard
R232 R233 R248: library part #1-085, <Rating>=1/16W, <Tolerance>=0.001, <Value>=33.2kOhm, Manufacturer 1=YAGEO, Manufacturer Part Number 1=RT0402BRD0733K2L, Supplier Part Number 1=YAG4244CT-ND, <Footprint>=0402, <Termination>=SMD, AL-PN=#1-085, Creator Project=DAP, Footprint Status=Verified, Lead Time="20 Weeks", PartType=Resistor, Status=Unverified, Supplier 1=Digikey, Supplier Label="33.2 kOhms ±0.1% 0.063W, 1/16W Chip Resistor 0402 (1005 Metric) Thin Film", Type=Standard
R234 R235: library part #1-024, <Rating>=1/16W, <Tolerance>=0.001, <Value>=5.1kOhm, Manufacturer 1=YAGEO, Manufacturer Part Number 1=RT0402BRE075K1L, Supplier Part Number 1=YAG4404TR-ND, <Footprint>=0402, <Termination>=SMD, AL-PN=#1-024, Creator Project=aRTy, Footprint Status=Verified, Lead Time="20 Weeks", PartType=Resistor, Status=Unverified, Supplier 1=Digikey, Supplier Label="5.1 kOhms ±0.1% 0.063W, 1/16W Chip Resistor 0402 (1005 Metric) Thin Film", Type=Standard
R236: library part #1-095, <Rating>=1/10W, <Tolerance>=0.001, <Value>=172kOhm, Manufacturer 1=YAGEO, Manufacturer Part Number 1=RT0603BRD07172KL, Supplier Part Number 1=13-RT0603BRD07172KLCT-ND, <Footprint>=0603, <Termination>=SMD, AL-PN=#1-095, Creator Project=DAP, Footprint Status=Verified, Lead Time="20 Weeks", PartType=Resistor, Status=Unverified, Supplier 1=Digikey, Supplier Label="172 kOhms ±0.1% 0.1W, 1/10W Chip Resistor 0603 (1608 Metric) Thin Film", Type=Standard
R302: library part #1-147, <Rating>=1/20W, <Tolerance>=0.01, <Value>=1kOhm, Manufacturer 1=YAGEO, Manufacturer Part Number 1=RC0201FR-071KL, Supplier Part Number 1=311-1KMCT-ND, <Termination>=SMD, AL-PN=#1-147, Creator Project=DAP, Footprint Status=Verified, Lead Time="24 Weeks", PartType=Resistor, Status=Unverified, Supplier 1=Digikey, Supplier Label="1 kOhms ±1% 0.05W, 1/20W Chip Resistor 0201 (0603 Metric) Moisture Resistant Thick Film", Type=Standard
R303: library part #1-148, <Rating>=1/20W, <Tolerance>=0.01, <Value>=1MOhm, Manufacturer 1=YAGEO, Manufacturer Part Number 1=RC0201FR-071ML, Supplier Part Number 1=311-1MMCT-ND, <Footprint>=0201, <Termination>=SMD, AL-PN=#1-148, Creator Project=DAP, Footprint Status=Verified, Lead Time="24 Weeks", PartType=Resistor, Status=Unverified, Supplier 1=Digikey, Supplier Label="1 MOhms ±1% 0.05W, 1/20W Chip Resistor 0201 (0603 Metric) Moisture Resistant Thick Film", Type=Standard
R304 R305 R306 R307 R308: library part #1-146, <Rating>=1/20W, <Tolerance>=0.01, <Value>=22Ohm, Manufacturer 1=YAGEO, Manufacturer Part Number 1=RC0201FR-0722RL, Supplier Part Number 1=YAG2518CT-ND, <Footprint>=0201, <Termination>=SMD, AL-PN=#1-146, Creator Project=DAP, Footprint Status=Verified, Lead Time="24 Weeks", PartType=Resistor, Status=Unverified, Supplier 1=Digikey, Supplier Label="22 Ohms ±1% 0.05W, 1/20W Chip Resistor 0201 (0603 Metric) Moisture Resistant Thick Film", Type=Standard
R423: library part #1-133, <Tolerance>=0.01, <Value>=32.4kOhm, Manufacturer 1=YAGEO, Manufacturer Part Number 1=RC0402FR-0732K4L, Supplier Part Number 1=YAG3119CT-ND, <Footprint>=0402, <Termination>=SMD, AL-PN=#1-133, Creator Project=DAP, Footprint Status=Verified, Lead Time="22 Weeks", PartType=Resistor, Status=Unverified, Supplier 1=Digikey, Supplier Label="32.4 kOhms ±1% 0.063W, 1/16W Chip Resistor 0402 (1005 Metric) Moisture Resistant Thick Film", Type=Standard
SW300: library part #1-115, <Value>=SPST, Manufacturer 1=C&K, Manufacturer Part Number 1="PTS810SJM250SMTR LFS", Package=None, Supplier Part Number 1=CKN10502CT-ND, <Footprint>=Vert, <Termination>=SMD, AL-PN=#1-115, Check_prices=https://www.snapeda.com/parts/PTS810%20SJM%20250%20SMTR%20LFS/C%2526K/view-part/?ref=eda, Creator Project=DAP, Footprint Status=Verified, Lead Time="16 Weeks", MF=C&K, MP="PTS810 SJM 250 SMTR LFS", PartType=Switch, SnapEDA_Link=https://www.snapeda.com/parts/PTS810%20SJM%20250%20SMTR%20LFS/C%2526K/view-part/?ref=snap, Status=Unverified, SubType=Tacticle, Supplier 1=Digikey, Supplier Label="Tactile Switch SPST-NO Top Actuated Surface Mount", Type=Standard
SW301: library part #1-115, Manufacturer 1=C&K, Manufacturer Part Number 1="PTS810SJM250SMTR LFS", Package=None, Supplier Part Number 1=CKN10502CT-ND, <Footprint>=Vert, <Termination>=SMD, AL-PN=#1-115, Check_prices=https://www.snapeda.com/parts/PTS810%20SJM%20250%20SMTR%20LFS/C%2526K/view-part/?ref=eda, Creator Project=DAP, Footprint Status=Verified, Lead Time="16 Weeks", MF=C&K, MP="PTS810 SJM 250 SMTR LFS", PartType=Switch, SnapEDA_Link=https://www.snapeda.com/parts/PTS810%20SJM%20250%20SMTR%20LFS/C%2526K/view-part/?ref=snap, Status=Unverified, SubType=Tacticle, Supplier 1=Digikey, Supplier Label="Tactile Switch SPST-NO Top Actuated Surface Mount", Type=Standard
SW400 SW401 SW402: library part #1-114, <Value>=SPST, Manufacturer 1=E-Switch, Manufacturer Part Number 1=TL1014BF220QG, Supplier Part Number 1=141-TL1014BF220QGCT-ND, <Footprint>=R/A, <Termination>=SMD, AL-PN=#1-114, Creator Project=DAP, Footprint Status=Verified, Lead Time="7 Weeks", PartType=Switch, Status=Unverified, SubType=Tacticle, Supplier 1=Digikey, Supplier Label="Tactile Switch SPST-NO Side Actuated Surface Mount, Right Angle", Type=Standard
U100 U101 U102: library part #1-104, Manufacturer 1="Texas Instruments", Manufacturer Part Number 1=OPA1612AIDRGR, Supplier Part Number 1=296-38367-1-ND, <Termination>=SMD, AL-PN=#1-104, Creator Project=DAP, Footprint Status=Verified, Lead Time="16 Weeks", PartType=IC, Status=Unverified, SubType=Op-Amp, Supplier 1=Digikey, Supplier Label="Audio Amplifier 2 Circuit Rail-to-Rail 8-SON (3x3)", Type=Standard
U103: library part #1-056, Manufacturer 1="Texas Instruments", Manufacturer Part Number 1=OPA1622IDRCR, Package="VSON-10 Texas Instruments", Supplier Part Number 1=296-45038-1-ND, <Termination>=SMD, AL-PN=#1-056, Check_prices=https://www.snapeda.com/parts/OPA1622IDRCR/Texas+Instruments/view-part/?ref=eda, Creator Project=DAP, Footprint Status=Verified, Lead Time="16 Weeks", MF="Texas Instruments", MP=OPA1622IDRCR, PartType=IC, SnapEDA_Link=https://www.snapeda.com/parts/OPA1622IDRCR/Texas+Instruments/view-part/?ref=snap, Status=Unverified, SubType=Op-Amp, Supplier 1=Digikey, Supplier Label="Audio Amplifier 2 Circuit 10-VSON (3x3)", Type=Standard
U200 U205: library part #1-050, Manufacturer 1="Analog Devices", Manufacturer Part Number 1=LTC3440EMS#TRPBF, Package="MSOP-10 Linear Technology", Supplier Part Number 1=LTC3440EMS#TRPBFCT-ND, <Termination>=SMD, AL-PN=#1-050, Check_prices=https://www.snapeda.com/parts/LTC3440EMS%23TRPBF/Analog+Devices/view-part/?ref=eda, Creator Project=DAP, Footprint Status=Verified, Lead Time="21 Weeks", MF="Analog Devices", MP=LTC3440EMS#TRPBF, PartType=IC, SnapEDA_Link=https://www.snapeda.com/parts/LTC3440EMS%23TRPBF/Analog+Devices/view-part/?ref=snap, Status=Unverified, SubType=Buck-Boost, Supplier 1=Digikey, Supplier Label="Buck-Boost Switching Regulator IC Positive Adjustable 2.5V 1 Output 600mA 10-TFSOP, 10-MSOP (0.118\", 3.00mm Width)", Type=Standard
U201: library part #1-089, Manufacturer 1="Analog Devices", Manufacturer Part Number 1=LT3462AES6#TRPBF, Manufacturer_Name="Analog Devices Inc", Manufacturer_Part_Number=LT3093EDD#TRPBF, Supplier Part Number 1=LT3462AES6#TRPBFCT-ND, <Termination>=SMD, AL-PN=#1-089, Copyright="Copyright (C) 2026 Ultra Librarian. All rights reserved.", Creator Project=DAP, Footprint Status=Verified, Lead Time="10 Weeks", PartType=IC, RefDes=RefDes, Status=Unverified, SubType=Regulator, Supplier 1=Digikey, Supplier Label="Cuk Switching Regulator IC Negative Adjustable -1.265V 1 Output 250mA SOT-23-6 Thin, TSOT-23-6", Type=Standard
U202: library part #1-054, Manufacturer 1="Texas Instruments", Manufacturer Part Number 1=BQ24250RGET, Package="VQFN-24 Texas Instruments", Supplier Part Number 1=296-36180-1-ND, <Termination>=SMD, AL-PN=#1-054, Check_prices=https://www.snapeda.com/parts/BQ24250RGET/Texas+Instruments/view-part/?ref=eda, Creator Project=DAP, Footprint Status=Verified, Lead Time="16 Weeks", MF="Texas Instruments", MP=BQ24250RGET, PartType=IC, SnapEDA_Link=https://www.snapeda.com/parts/BQ24250RGET/Texas+Instruments/view-part/?ref=snap, Status=Unverified, SubType=Charger, Supplier 1=Digikey, Supplier Label="Charger IC Lithium Ion 24-VQFN (4x4)", Type=Standard
U203: library part #1-052, Manufacturer 1="Analog Devices", Manufacturer Part Number 1=LT3093EDD#TRPBF, Manufacturer_Name="Analog Devices Inc", Supplier Part Number 1=505-LT3093EDD#TRPBFCT-ND, <Termination>=SMD, AL-PN=#1-052, Copyright="Copyright (C) 2026 Ultra Librarian. All rights reserved.", Creator Project=DAP, Footprint Status=Verified, Lead Time="21 Weeks", Manufacturer_Part_Number=LT3093EDD#TRPBF, PartType=IC, RefDes=RefDes, Status=Unverified, SubType=LDO, Supplier 1=Digikey, Supplier Label="Linear Voltage Regulator IC Negative Adjustable 1 Output 200mA 12-DFN (3x3)", Type=Standard
U204 U206: library part #1-051, Manufacturer 1="Analog Devices", Manufacturer Part Number 1=LT3042EDD#PBF, Package="DFN-10 Linear Technology", Supplier Part Number 1=505-LT3042EDD#PBF-ND, <Termination>=SMD, AL-PN=#1-051, Check_prices=https://www.snapeda.com/parts/LT3042EDD%23PBF/Analog+Devices/view-part/?ref=eda, Creator Project=DAP, Footprint Status=Verified, Lead Time="21 Weeks", MF="Analog Devices", MP=LT3042EDD#PBF, PartType=IC, SnapEDA_Link=https://www.snapeda.com/parts/LT3042EDD%23PBF/Analog+Devices/view-part/?ref=snap, Status=Unverified, SubType=LDO, Supplier 1=Digikey, Supplier Label="Linear Voltage Regulator IC Positive Adjustable 1 Output 200mA 10-DFN (3x3)", Type=Standard
U300: library part #1-124, <Rating>=133MHz, <Value>=64Bit, Manufacturer 1="Gigadevice Electronics Singapore PTE.LTD.", Manufacturer Part Number 1=GD25B64EWIGR, Supplier Part Number 1=1970-GD25B64EWIGRCT-ND, <Termination>=SMD, AL-PN=#1-124, Creator Project=DAP, Footprint Status=Verified, Lead Time=N/A, PartType=IC, Status=Unverified, SubType=FLASH, Supplier 1=Digikey, Supplier Label="FLASH - NOR (SLC) Memory IC 64Mbit SPI - Quad I/O 133 MHz 7 ns 8-WSON (5x6)", Type=Standard
U301: library part #1-055, Manufacturer 1="Espressif Technologies", Package=None, Supplier Part Number 1=1965-ESP32-S3-ND, <Termination>=SMD, AL-PN=#1-055, Availability="In Stock", Check_prices=https://www.snapeda.com/parts/ESP32-S3/Espressif+Systems/view-part/?ref=eda, Creator Project=DAP, Footprint Status=Verified, Lead Time="8 Weeks", Manufacturer Part Number 1=ESP32-S3, MF="Espressif Systems", MP=ESP32-S3, PartType=MCU, Price=None, Purchase-URL=https://pricing.snapeda.com/search/part/ESP32-S3/?ref=eda, SnapEDA_Link=https://www.snapeda.com/parts/ESP32-S3/Espressif+Systems/view-part/?ref=snap, Status=Unverified, SubType=ESP-32, Supplier 1=Digikey, Supplier Label="IC RF TxRx + MCU Bluetooth, WiFi 802.11b/g/n, Bluetooth v5.0 2.412GHz ~ 2.484GHz 56-VFQFN Exposed Pad", Type=Standard
U400: library part #1-128, Manufacturer 1="Rohm Semiconductor", Manufacturer Part Number 1=BD1604MUV-E2, Manufacturer_Name="ROHM Semiconductor", Supplier Part Number 1=BD1604MUV-E2CT-ND, <Termination>=SMD, AL-PN=#1-128, Copyright="Copyright (C) 2025 Ultra Librarian. All rights reserved.", Creator Project=DAP, Footprint Status=Verified, Lead Time="12 Weeks", Manufacturer_Part_Number=BD1604MUV-E2, Notes="Very slightly off", PartType=IC, RefDes=RefDes, Status=Unverified, SubType="LED Driver", Supplier 1=Digikey, Supplier Label="LED Driver IC 4 Output DC DC Regulator Switched Capacitor (Charge Pump) Dimming 30mA VQFN016V3030", Type=Standard
Y100: library part #1-100, <Rating>=2.2mA, <Value>=22.5792MHz, Manufacturer 1="ECS Inc.", Manufacturer Part Number 1=ECS-2520MVLC-225.792-CN-TR, Package=None, Supplier Part Number 1=50-ECS-2520MVLC-225.792-CN-TRCT-ND, <Termination>=SMD, AL-PN=#1-100, Availability=Unavailable, Creator Project=DAP, Footprint Status=Verified, Lead Time="19 Weeks", MP=ASTX-H11-24.576MHZ-T, PartType=Oscillator, Price=None, Status=Unverified, SubType=Crystal, Supplier 1=Digikey, Supplier Label="22.5792 MHz XO (Standard) CMOS Oscillator 1.6V ~ 3.6V Enable/Disable 4-SMD, No Lead", Type=Standard
Y101: library part #1-101, <Rating>=5.5mA, <Value>=24.576MHz, Manufacturer 1="Abracon LLC", Manufacturer Part Number 1=ASTX-H11-24.576MHZ-T, Package=None, Supplier Part Number 1=535-12038-1-ND, <Termination>=SMD, AL-PN=#1-101, Availability=Unavailable, Creator Project=DAP, Footprint Status=Verified, Lead Time="16 Weeks", MP=ASTX-H11-24.576MHZ-T, PartType=Oscillator, Price=None, Status=Unverified, SubType=Crystal, Supplier 1=Digikey, Supplier Label="24.576 MHz TCXO HCMOS Oscillator 3.3V Enable/Disable 4-SMD, No Lead", Type=Standard

## Free pads (board coordinates)
  round 196.85 hole 125.98: ""(157.48,157.48) ""(157.48,2401.57) ""(2401.57,157.48) ""(2401.57,2401.57)

## Via types
v1: diameter 19.68, hole 9.84, L1 (SIG/PWR) to L6 (SIG/PWR), tented both sides, 237 vias
v2: diameter 27.56, hole 13.78, L1 (SIG/PWR) to L6 (SIG/PWR), tented both sides, 56 vias
v3: diameter 49.21, hole 29.53, L1 (SIG/PWR) to L6 (SIG/PWR), 6 vias
v4: diameter 19.68, hole 9.84, L1 (SIG/PWR) to L6 (SIG/PWR), 1 vias

## Nets (pads, with @x,y where several pads share a name; then routed paths per layer and width w, separated by ;. In a path a pad name is that pad's centre, name@x,y a point inside that pad or via, vN(x,y) a via of type N, cw(c..) or ccw(c..) an arc to the next point about the centre after c; other vN are vias at no path point)
22.5792_OUT: R104.1 Y100.3 | length 54.4
  L1 (SIG/PWR) w6: R104.1@2329.68,820 2329.68,821.97 2346.97,839.25 2356.45,839.25 2368,850.8 Y100.3@2368,853
24.576_OUT: R105.2 Y101.3 | length 47
  L1 (SIG/PWR) w6: R105.2@2330,782 2372,782 Y101.3@2372,787
40MHz_IN: C308.1 CR300.1 L301.1 | length 90.1
  L1 (SIG/PWR) w6: C308.1@1020,1409.25 1020.43,1408.82 1053.18,1408.82 CR300.1@1067,1395 ; L301.1@1066,1356.81 CR300.1@1066,1394
40MHz_OUT: C310.1 CR300.3 U301.53 | length 246.6
  L1 (SIG/PWR) w6: U301.53@1082.13,1274.24 1082.13,1302.13 1135,1355 1135,1417.28 1113,1439.28 CR300.3@1113,1443 ; CR300.3@1104.67,1449.57 1112.75,1457.65 1112.75,1492.75 C310.1@1113,1493
+3V3_ANALOG: C102.2 C103.2 C104.2 C105.2 C109.2 C111.2 C126.2 C128.2 C129.2 C217.3 R222.2 R251.2 TP205.1 U100.8 U101.8 U102.8 U103.2 U204.10 Y100.4 Y101.4 | length 3062.8
  L1 (SIG/PWR) w10: R222.2@1553,1328 1552.53,1328 1551,1326.47 1551,1299 1606,1244 1925.19,1244 ; v1(1833.14,1457.99) 1946,1457.99 ; 1874,1456 1874,1327.4 1925.19,1276.22 1925.19,1244 ; v1(1925.19,1145) 1925.19,1244 ; v1@2115.17,1597 2094.09,1575.91 ; 2195,1198.9 2195,1068.9 2254,1009.9 2477,1009.9 2540,946.9 2540,851 ; v1@2270.84,1178.31 2270.84,1180.16 2252.28,1198.72 2151.77,1198.72 1946,1404.5 1946,1457.99 ; R251.2@2276,1693 2273.32,1690.32 2273.32,1600.32 2248.91,1575.91 2094.09,1575.91 ; 1946,1457.99 1976.16,1457.99 2094.09,1575.91
  L4 (PWR) w10: v1(1715.23,1427.39) 1715.43,1427.2 v1@1742.2,1427.2 ; v1(1743,1427) 1774,1458 v1@1834,1458 ; v1(2385,599) 2423,599 2506.01,682.01 v1@2506.01,981.99
  other v1: 2506.01,979.99 2274,1177 2115.94,1597.77
+3V3_DAC: B100.1 B100.10 B100.12 B100.27 C112.2 C113.2 C114.2 C115.2 C116.2 C119.2 C120.2 C121.2 C231.3 R243.2 TP206.1 U206.10 | length 1118.3
  L4 (PWR) w10: v1@1749.61,866.86 v1(1749.61,839.48) 1873,839.48 ; v1@1938.15,800 1898.66,839.48 1873,839.48 ; v1@2059,859 2059,861.15 2006.15,914 1947.52,914 1917.26,883.74 ; v1@2231,833 2230,832 2230,705 2233,702 ; v1(2296.08,743.07) 2255.01,702 2233,702 ; 1873,839.48 1917.26,883.74 ; 1917.26,883.74 1992,809 1992,775 2091,676 2182,676 2208,702 2233,702
  other v1: 1939.08,799.07 2230,834 2062.08,858.07 1750,867.25